# Altium PCB OmniCore_SDR.PcbDoc (part 8 of 14)
Units mil, origin at the board's own origin, x right, y up, seen from the top; angles counter-clockwise.
Board outline 4724.72 x 2755.91 mil, 8 copper layers (Top, GND 1, Layer 1, Layer 2, GND 2, Layer 3, Power, Bottom), stack 40.468 mil thick; 534 components, 427 nets, 2325 pads, 1892 vias.
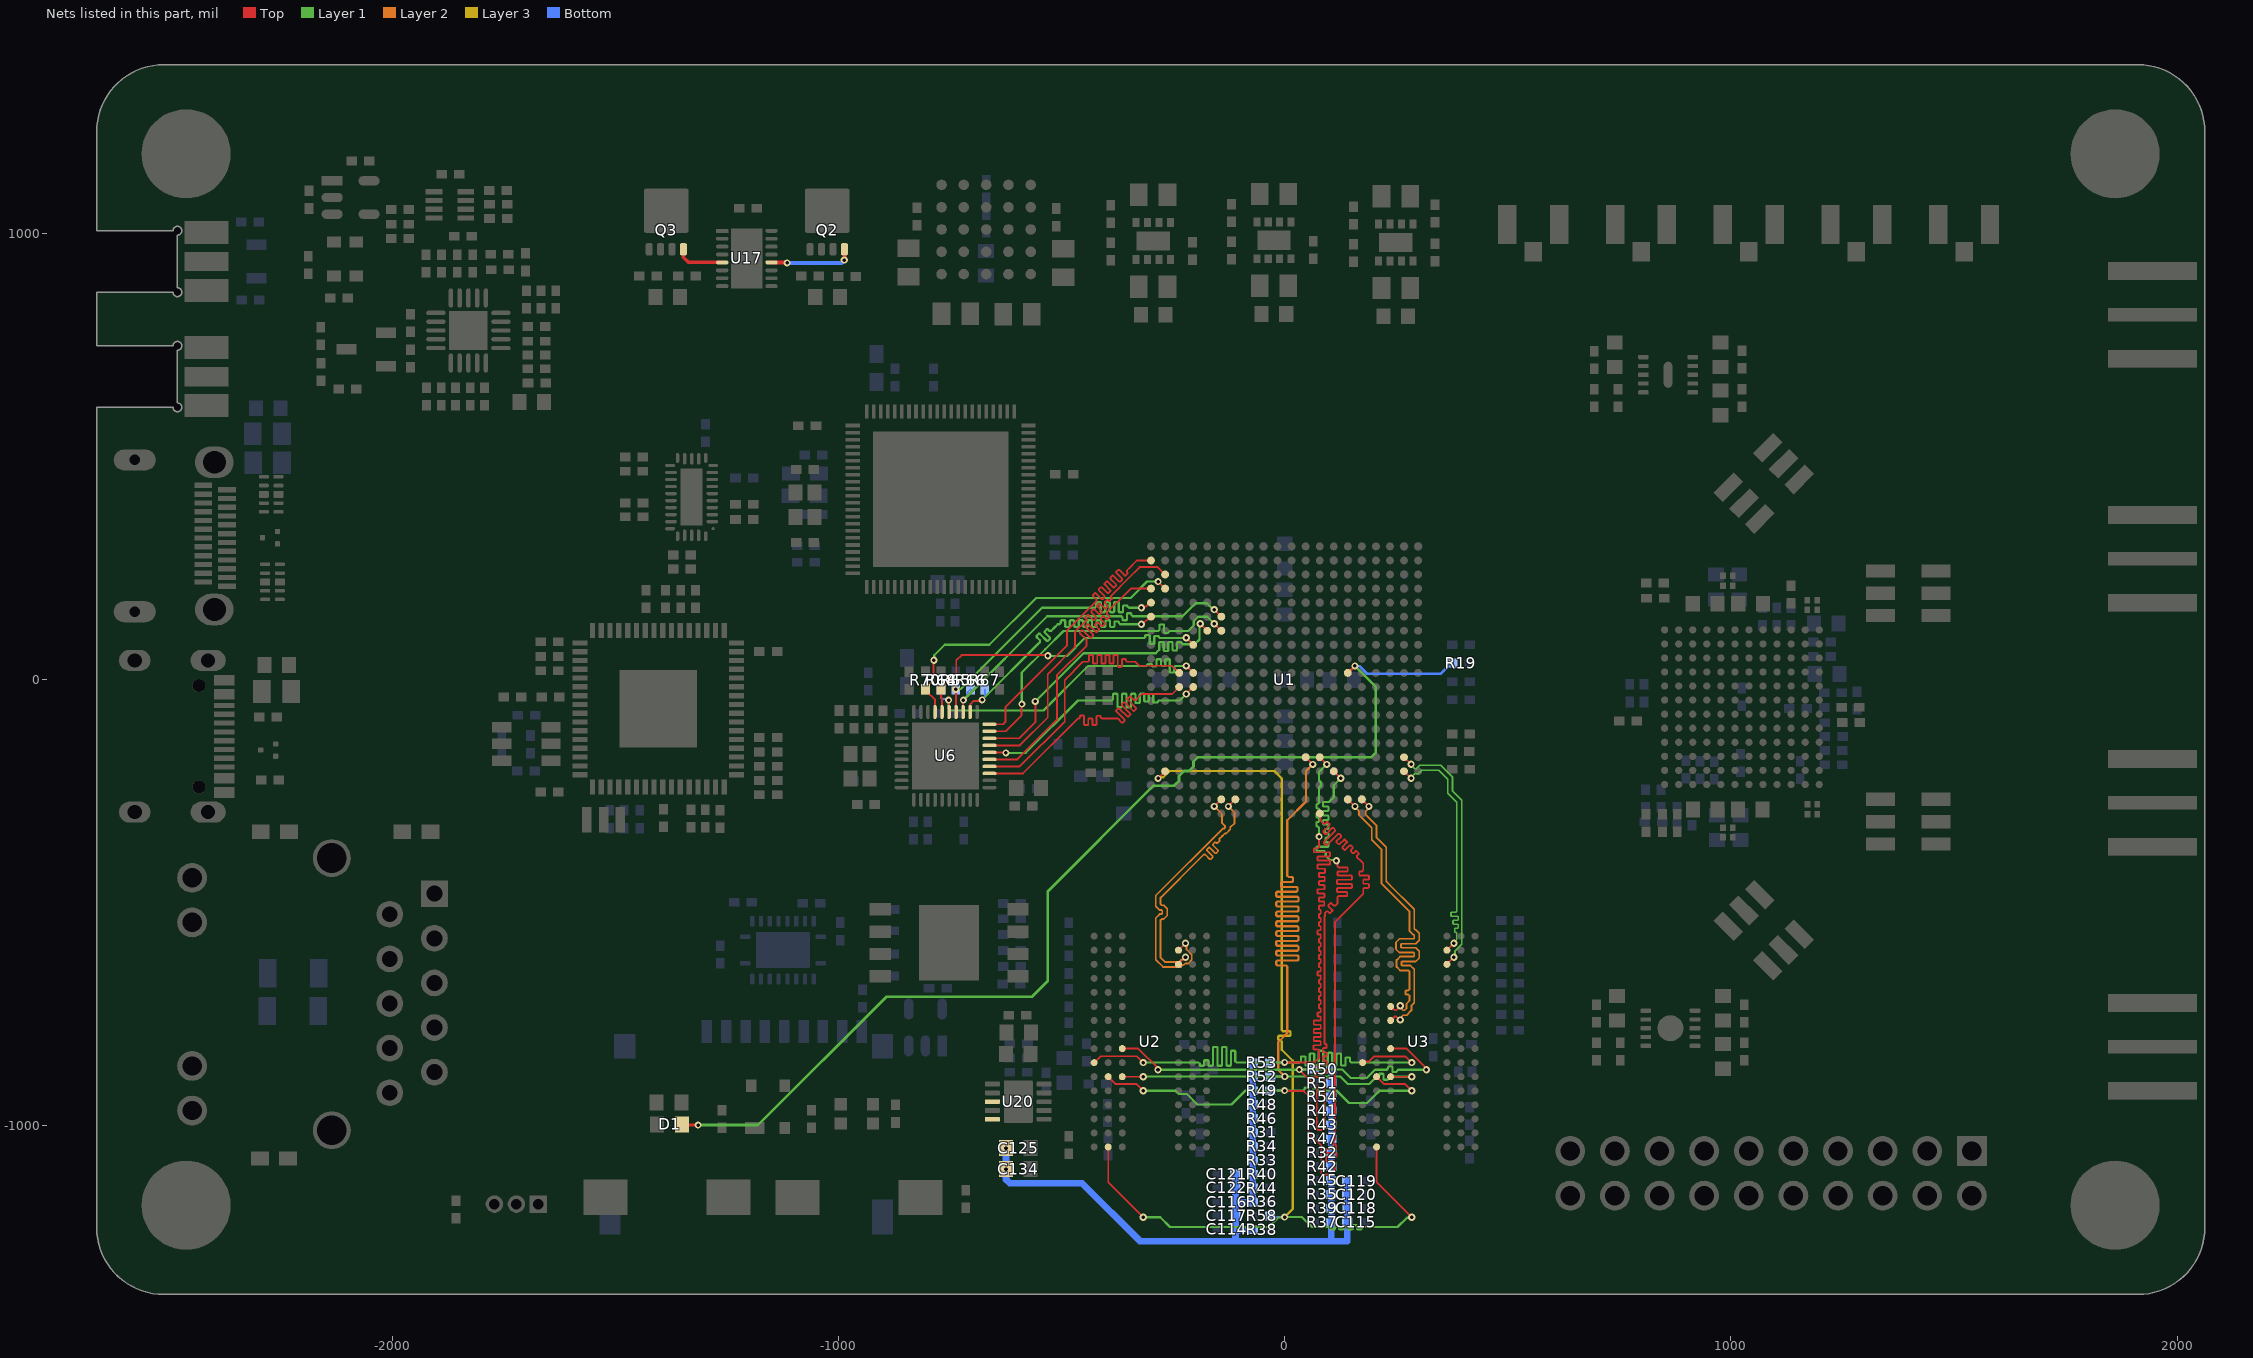
[diagram p13: the nets of this part, all layers, seen from the top]

## Via types
v1: diameter 16, hole 8, Top to Bottom, tented both sides, 1844 vias
v2: diameter 19.68, hole 7.87, Top to Bottom, 44 vias
v3: diameter 200, hole 125, Top to Bottom, 4 vias

## Nets (pads, with @x,y where several pads share a name; then routed paths per layer and width w, separated by ;. In a path a pad name is that pad's centre, name@x,y a point inside that pad or via, vN(x,y) a via of type N, cw(c..) or ccw(c..) an arc to the next point about the centre after c; other vN are vias at no path point) (continued)
DDR3_DQS1_N: U1.F2 U2.B7 | length 618.8
  Top w4: U2.B7@-238,-606.49 v1(-222.25,-590.75) ; v1(-157.72,-284.25) U1.F2@-141.98,-268.5
  Layer 2 w4: v1(-222.25,-590.75) -219.96,-593.04 -219.96,-604.74 -208.25,-616.44 -208.25,-628.04 -216.45,-636.24 -223.04,-636.24 -226.04,-639.24 -227.55,-639.24 -232.4,-644.09 -272.47,-644.09 -289,-627.56 -289,-549 -289,-534.35 -280.21,-525.57 -275.71,-525.57 -274.36,-524.22 -274.36,-517.92 -275.71,-516.57 -280.21,-516.57 -289,-507.78 -289,-498 -289,-483.97 -138.93,-333.89 -135.88,-333.89 -133.54,-331.55 -133.54,-328.24 -140.23,-321.55 -140.23,-301.75 v1(-157.72,-284.25)
DDR3_DQS1_P: U1.G2 U2.C7 | length 619.1
  Top w4: U2.C7@-238,-637.99 v1(-222.25,-622.24) ; v1(-126.23,-284.25) U1.G2@-110.48,-268.5
  Layer 2 w4: v1(-222.25,-622.24) -224.6,-622.24 -230.6,-628.24 -232.11,-628.24 -236.96,-633.09 -267.91,-633.09 -278,-623 -278,-549 -278,-538.91 -275.66,-536.57 -271.15,-536.57 -263.36,-528.77 -263.36,-513.36 -271.15,-505.57 -275.66,-505.57 -278,-503.22 -278,-498 -278,-488.52 -189.24,-399.76 -181.46,-391.98 -178.15,-391.98 -167.53,-402.6 -165.62,-402.6 -161.17,-398.14 -161.17,-396.24 -174.61,-382.8 -174.61,-380.89 -170.15,-376.43 -168.24,-376.43 -155.69,-388.98 -153.78,-388.98 -149.33,-384.53 -149.33,-382.62 -160.71,-371.23 -160.71,-369.32 -156.26,-364.87 -154.35,-364.87 -152.69,-366.53 -150.78,-366.53 -146.33,-362.07 -146.33,-360.16 -146.33,-356.85 -140.24,-350.76 -134.37,-344.89 -131.33,-344.89 -121.78,-335.35 -121.78,-331.1 -112.23,-321.55 -112.23,-298.25 v1(-126.23,-284.25)
DDR3_DQS2_N: U1.T2 U3.G3 | length 730.1
  Top w4: U1.T2@172.98,-268.5 v1(188.73,-284.25) ; U3.G3@237.51,-763.97 246.26,-755.23 250.2,-755.23 257.52,-762.55 257.52,-763.97 v1(259,-762.5)
  Layer 2 w4: v1(188.73,-284.25) 188.73,-287.5 181.48,-294.75 181.48,-302.87 206,-327.38 206,-354 227.72,-375.72 227.72,-452.17 234.78,-459.22 290.5,-514.94 290.5,-553.22 290.5,-558.44 292.84,-560.79 293.71,-560.79 301.5,-568.58 301.5,-583.99 293.71,-591.79 261.85,-591.79 260.5,-593.14 260.5,-599.44 261.85,-600.79 293.71,-600.79 301.5,-608.58 301.5,-623.99 293.71,-631.79 263.06,-631.79 261.71,-633.14 261.71,-639.44 263.06,-640.79 281.71,-640.79 290.5,-649.57 290.5,-667 290.5,-724.44 284,-730.94 284,-741.36 273.11,-752.25 265.24,-752.25 262.89,-754.59 262.89,-755.35 259,-759.25 v1(259,-762.5)
DDR3_DQS2_P: U1.R2 U3.F3 | length 730.3
  Top w4: U1.R2@141.49,-268.5 141.69,-268.5 157.44,-284.25 v1(157.64,-284.25) ; U3.F3@238.99,-731 U3.F3@237.51,-732.48 246.26,-741.23 250.2,-741.23 259,-732.43 v1(259,-731)
  Layer 2 w4: v1(157.64,-284.25) 157.64,-285.68 166.82,-294.87 166.82,-303.76 195,-331.94 195,-358.56 216.72,-380.28 216.72,-456.72 230.89,-470.89 279.5,-519.5 279.5,-553.22 279.5,-563 288.29,-571.79 289.15,-571.79 290.5,-573.14 290.5,-579.44 289.15,-580.79 257.29,-580.79 249.5,-588.58 249.5,-603.99 257.29,-611.79 289.15,-611.79 290.5,-613.14 290.5,-619.44 289.15,-620.79 258.51,-620.79 250.71,-628.58 250.71,-643.99 258.51,-651.79 277.16,-651.79 279.5,-654.13 279.5,-667 279.5,-675 279.5,-694.31 277.16,-696.66 271.92,-696.66 270.57,-698.01 270.57,-704.31 271.92,-705.66 277.16,-705.66 279.5,-708 279.5,-710 279.5,-719.89 273,-726.39 273,-736.8 268.55,-741.25 265.24,-741.25 262.89,-738.9 262.89,-738.14 259,-734.25 v1(259,-731)
DDR3_DQS3_N: U1.W4 U3.B7 | length 576.8
  Top w4: U1.W4@267.47,-205.51 v1(283.22,-221.26) ; U3.B7@363.5,-606.49 v1(379.25,-590.75)
  Layer 1 w4: v1(283.22,-221.26) 283.22,-218.92 291.13,-211.01 299,-211.01 307.01,-203 345,-203 365.37,-223.37 365.37,-254.93 385.74,-275.3 385.74,-508 385.74,-519 383.4,-521.34 373.85,-521.34 372.5,-522.69 372.5,-528.99 373.85,-530.34 387.39,-530.34 388.74,-531.69 388.74,-537.99 387.39,-539.34 378.49,-539.34 377.14,-540.69 377.14,-546.99 378.49,-548.34 387.39,-548.34 388.74,-549.69 388.74,-555.99 387.39,-557.34 382.47,-557.34 381.12,-558.69 381.12,-564.99 382.47,-566.34 383.4,-566.34 385.74,-568.69 385.74,-581.17 385.74,-582.4 379.25,-588.9 v1(379.25,-590.75)
DDR3_DQS3_P: U1.W5 U3.C7 | length 576.8
  Top w4: U1.W5@267.47,-174.02 v1(283.22,-189.76) ; U3.C7@363.5,-637.99 v1(379.25,-622.24)
  Layer 1 w4: v1(283.22,-189.76) 283.22,-192.1 291.13,-200.01 294.44,-200.01 302.46,-192 349.56,-192 376.37,-218.81 376.37,-250.37 396.74,-270.74 396.74,-593.5 381.54,-608.7 381.54,-619.95 v1(379.25,-622.24)
DDR3_ODT: R53.2 U1.N5 U2.K1 U3.K1 | length 2637.1
  Top w4.2: U2.K1@-426.98,-858.46 -412.51,-844 -331.32,-844 v1(-316.85,-858.46) ; v1(0,-858) 12,-858 66,-858 77,-847 77,-833.25 77,-831.15 74.54,-828.69 65.81,-828.69 64.89,-827.77 64.89,-820.41 65.81,-819.49 79.78,-819.49 80.7,-818.57 80.7,-811.21 79.78,-810.29 66.02,-810.29 65.1,-809.37 65.1,-802.01 66.02,-801.09 79.78,-801.09 80.7,-800.17 80.7,-792.81 79.78,-791.89 66.02,-791.89 65.1,-790.97 65.1,-783.61 66.02,-782.69 79.78,-782.69 80.7,-781.77 80.7,-774.41 79.78,-773.49 66.02,-773.49 65.1,-772.57 65.1,-765.21 66.02,-764.29 79.78,-764.29 80.7,-763.37 80.7,-756.01 79.78,-755.09 74.84,-755.09 73.92,-754.17 73.92,-746.81 74.84,-745.89 79.78,-745.89 80.7,-744.97 80.7,-737.61 79.78,-736.69 77.92,-736.69 77,-735.77 77,-728.41 77.92,-727.49 79.78,-727.49 80.7,-726.57 80.7,-719.21 79.78,-718.29 77.57,-718.29 76.64,-717.37 76.64,-710.01 77.57,-709.09 79.78,-709.09 80.7,-708.17 80.7,-700.81 79.78,-699.89 77.92,-699.89 77,-698.97 77,-691.61 77.92,-690.69 79.78,-690.69 80.7,-689.77 80.7,-682.41 79.78,-681.49 77.92,-681.49 77,-680.57 77,-673.21 77.92,-672.29 79.78,-672.29 80.7,-671.37 80.7,-664.01 79.78,-663.09 74.84,-663.09 73.92,-662.17 73.92,-654.81 74.84,-653.89 79.78,-653.89 80.7,-652.97 80.7,-645.61 79.78,-644.69 77.92,-644.69 77,-643.77 77,-636.41 77.92,-635.49 79.78,-635.49 80.7,-634.57 80.7,-627.21 79.78,-626.29 77.57,-626.29 76.64,-625.37 76.64,-618.01 77.57,-617.09 79.78,-617.09 80.7,-616.17 80.7,-608.81 79.78,-607.89 77.92,-607.89 77,-606.97 77,-599.61 77.92,-598.69 79.78,-598.69 80.7,-597.77 80.7,-590.41 79.78,-589.49 77.92,-589.49 77,-588.57 77,-581.21 77.92,-580.29 79.78,-580.29 80.7,-579.37 80.7,-572.01 79.78,-571.09 74.84,-571.09 73.92,-570.17 73.92,-562.81 74.84,-561.89 79.78,-561.89 80.7,-560.97 80.7,-553.61 79.78,-552.69 77.92,-552.69 77,-551.77 77,-544.41 77.92,-543.49 79.78,-543.49 80.7,-542.57 80.7,-535.21 79.78,-534.29 77.57,-534.29 76.64,-533.37 76.64,-526.01 77.57,-525.09 79.78,-525.09 80.7,-524.17 80.7,-516.81 79.78,-515.89 77.92,-515.89 77,-514.97 77,-507.61 77.92,-506.69 87.74,-506.69 88.66,-505.77 88.66,-498.41 87.74,-497.49 77.92,-497.49 77,-496.57 77,-489.21 77.92,-488.29 87.98,-488.29 88.9,-487.37 88.9,-480.01 87.98,-479.09 74.84,-479.09 73.92,-478.17 73.92,-470.81 74.84,-469.89 87.98,-469.89 88.9,-468.97 88.9,-461.61 87.98,-460.69 77.92,-460.69 77,-459.77 77,-452.41 77.92,-451.49 88.98,-451.49 89.9,-450.57 89.9,-443.21 88.98,-442.29 77.57,-442.29 76.64,-441.37 76.64,-434.01 77.57,-433.09 89.05,-433.09 89.97,-432.17 89.97,-424.81 89.05,-423.89 74.77,-423.89 73.85,-422.97 73.85,-415.61 74.77,-414.69 100.98,-414.69 101.9,-413.77 101.9,-406.41 100.98,-405.49 74.77,-405.49 73.85,-404.57 73.85,-397.21 74.77,-396.29 100.98,-396.29 101.9,-395.37 101.9,-388.01 100.98,-387.09 66.55,-387.09 65.63,-386.17 65.63,-378.81 66.55,-377.89 74.54,-377.89 77,-375.43 77,-368 v1(77,-352) ; U1.N5@78.5,-174.02 78.5,-174.13 94.24,-189.88 v1(94.24,-190) ; U3.K1@174.52,-858.46 176.73,-856.26 188.48,-856.26 200.23,-844.5 270.68,-844.5 v1(284.64,-858.46)
  Layer 1 w5: v1(-316.85,-858.46) -316.62,-858.23 -280,-858.23 -206,-858.23 -193.5,-858.23 -190.57,-861.16 -190.57,-863.71 -189.07,-865.21 -182.07,-865.21 -180.57,-863.71 -180.57,-854.53 -179.07,-853.03 -172.07,-853.03 -170.57,-854.53 -170.57,-863.71 -169.07,-865.21 -162.07,-865.21 -160.57,-863.71 -160.57,-824.73 -159.07,-823.23 -152.07,-823.23 -150.57,-824.73 -150.57,-863.71 -149.07,-865.21 -142.07,-865.21 -140.57,-863.71 -140.57,-824.73 -139.07,-823.23 -132.07,-823.23 -130.57,-824.73 -130.57,-863.71 -129.07,-865.21 -122.07,-865.21 -120.57,-863.71 -120.57,-833.48 -119.07,-831.98 -112.07,-831.98 -110.57,-833.48 -110.57,-855.3 -107.64,-858.23 -89,-858.23 -0.23,-858.23 v1(0,-858) 0.23,-858.23 31,-858.23 33.5,-858.23 36.43,-855.3 36.43,-845.93 37.93,-844.43 44.93,-844.43 46.43,-845.93 46.43,-863.48 47.93,-864.98 54.93,-864.98 56.43,-863.48 56.43,-839.48 57.93,-837.98 64.93,-837.98 66.43,-839.48 66.43,-863.48 67.93,-864.98 74.93,-864.98 76.43,-863.48 76.43,-833.13 77.93,-831.63 84.93,-831.63 86.43,-833.13 86.43,-863.48 87.93,-864.98 94.93,-864.98 96.43,-863.48 96.43,-837.54 97.93,-836.04 104.93,-836.04 106.43,-837.54 106.43,-863.48 107.93,-864.98 114.93,-864.98 116.43,-863.48 116.43,-839.44 117.93,-837.94 124.93,-837.94 126.43,-839.44 126.43,-863.48 127.93,-864.98 134.93,-864.98 136.43,-863.48 136.43,-848.17 137.93,-846.67 144.93,-846.67 146.43,-848.17 146.43,-855.3 149.36,-858.23 165.18,-858.23 202.56,-858.23 284.41,-858.23 v1(284.64,-858.46) ; v1(77,-352) 77,-334.44 77,-331.94 74.07,-329.01 73,-329.01 71.5,-327.51 71.5,-320.51 73,-319.01 75.5,-319.01 77,-317.51 77,-310.51 75.5,-309.01 73,-309.01 71.5,-307.51 71.5,-300.51 73,-299.01 75.5,-299.01 77,-297.51 77,-290.51 75.5,-289.01 73,-289.01 71.5,-287.51 71.5,-280.51 73,-279.01 74.07,-279.01 77,-276.09 77,-241.94 79.93,-239.01 79.99,-239.01 81.49,-237.51 81.49,-230.51 79.99,-229.01 79.93,-229.01 77,-226.09 77,-217 77,-207.01 94.01,-190 v1(94.24,-190)
  Bottom w4.2: R53.2@-32,-859 -31,-858 v1(0,-858)
DDR3_RAS: R50.2 U1.P4 U2.J3 U3.J3 | length 2366.9
  Top w4.2: U2.J3@-363.98,-826.97 -328.41,-826.97 -283.85,-871.52 v1(-283.85,-874.44) ; v1(33.07,-874) 72,-912.92 72,-1007.21 74.46,-1009.67 86.44,-1009.67 88.9,-1007.21 88.9,-895 88.9,-892.9 86.44,-890.44 70.28,-890.44 68.9,-889.06 68.9,-882.62 70.28,-881.24 92.42,-881.24 93.8,-879.86 93.8,-873.42 92.42,-872.04 76.14,-872.04 74.76,-870.66 74.76,-864.22 76.14,-862.84 92.42,-862.84 93.8,-861.46 93.8,-855.02 92.42,-853.64 86.58,-853.64 85.2,-852.26 85.2,-845.82 86.58,-844.44 92.42,-844.44 93.8,-843.06 93.8,-836.62 92.42,-835.24 86.58,-835.24 85.2,-833.86 85.2,-827.42 86.58,-826.04 92.42,-826.04 93.8,-824.66 93.8,-818.22 92.42,-816.84 91.36,-816.84 88.9,-814.38 88.9,-531.1 90.39,-529.61 90.39,-526.14 89.86,-525.61 89.86,-523.66 94.42,-519.11 96.37,-519.11 100.36,-523.1 102.31,-523.1 106.86,-518.54 106.86,-516.59 97.8,-507.53 97.8,-505.57 102.35,-501.02 104.3,-501.02 109.9,-506.62 113.38,-506.62 118.1,-501.9 118.1,-499.07 118.1,-487.77 120.56,-485.31 138.71,-485.31 140.09,-483.93 140.09,-477.49 138.71,-476.11 118.41,-476.11 117.03,-474.73 117.03,-468.29 118.41,-466.91 149.42,-466.91 150.8,-465.53 150.8,-459.09 149.42,-457.71 118.48,-457.71 117.1,-456.33 117.1,-449.89 118.48,-448.51 149.42,-448.51 150.8,-447.13 150.8,-440.69 149.42,-439.31 119.48,-439.31 118.1,-437.93 118.1,-431.49 119.48,-430.11 139.94,-430.11 141.32,-428.73 141.32,-422.29 139.94,-420.91 120.56,-420.91 118.1,-418.45 118.1,-408.1 v1(116,-406) ; U1.P4@109.99,-205.51 v1(125.74,-221.26) ; U3.J3@237.51,-826.97 273.09,-826.97 317.64,-871.52 v1(317.64,-874.44)
  Layer 1 w5: v1(-283.85,-874.44) -283.62,-874.21 v1@32.86,-874.21 ; v1@33,-873.98 128.98,-873.98 148,-893 184,-893 202.56,-874.44 226,-874.44 228.5,-874.44 231.43,-871.51 231.43,-868.73 232.93,-867.23 239.93,-867.23 241.43,-868.73 241.43,-878.14 242.93,-879.64 249.93,-879.64 251.43,-878.14 251.43,-877.37 254.36,-874.44 288,-874.44 v1(317.64,-874.44) ; v1(116,-406) 114.04,-404.04 100.5,-404.04 92,-395.54 92,-390 92,-387.5 89.07,-384.57 73,-384.57 71.5,-383.07 71.5,-376.07 73,-374.57 96.5,-374.57 98,-373.07 98,-366.07 96.5,-364.57 93,-364.57 91.5,-363.07 91.5,-356.07 93,-354.57 96.5,-354.57 98,-353.07 98,-346.07 96.5,-344.57 91.58,-344.57 90.08,-343.07 90.08,-336.07 91.58,-334.57 96.5,-334.57 98,-333.07 98,-326.07 96.5,-324.57 87.5,-324.57 86,-323.07 86,-316.07 87.5,-314.57 96.5,-314.57 98,-313.07 98,-306.07 96.5,-304.57 87.5,-304.57 86,-303.07 86,-296.07 87.5,-294.57 96.5,-294.57 98,-293.07 98,-286.07 96.5,-284.57 87.5,-284.57 86,-283.07 86,-276.07 87.5,-274.57 99.43,-274.57 110,-264 110,-237 v1(125.74,-221.26)
  Bottom w4.2: v1(33.07,-874) 64,-874 R50.2@65,-873
DDR3_RESET: R58.1 U1.B4 U2.T2 U3.T2 | length 2447.3
  Top w4.2: U2.T2@-395.48,-1047.44 -395.48,-1126.29 v1(-316.85,-1204.92) ; v1(-283.71,-221.27) U1.B4@-267.96,-205.51 ; U3.T2@206.02,-1047.44 206.02,-1126.29 v1(284.64,-1204.92)
  Layer 1 w5: v1(-316.85,-1204.92) -279.08,-1204.92 -257,-1227 -35,-1227 -13.19,-1205.19 -0.73,-1205.19 v1(0,-1204.46) 38.46,-1204.46 61,-1227 87,-1227 99.5,-1227 102.43,-1229.93 102.43,-1230.5 103.93,-1232 110.93,-1232 112.43,-1230.5 112.43,-1228.5 113.93,-1227 120.93,-1227 122.43,-1228.5 122.43,-1230.5 123.93,-1232 130.93,-1232 132.43,-1230.5 132.43,-1227.65 133.93,-1226.15 140.93,-1226.15 142.43,-1227.65 142.43,-1230.5 143.93,-1232 150.93,-1232 152.43,-1230.5 152.43,-1224.5 153.93,-1223 160.93,-1223 162.43,-1224.5 162.43,-1230.45 163.93,-1231.95 170.93,-1231.95 172.43,-1230.45 172.43,-1229.93 175.36,-1227 202,-1227 253,-1227 273.9,-1206.1 283.47,-1206.1 v1(284.64,-1204.92)
  Layer 3 w5: v1(-283.71,-221.27) -281.6,-219.16 -275.44,-219.16 -275.28,-219 -271.84,-219 -257.84,-205 -23,-205 -6.5,-221.5 -6.5,-494.4 -6.8,-494.7 -6.8,-782.9 -6.8,-785.4 -3.87,-788.33 11.7,-788.33 13.2,-789.83 13.2,-796.83 11.7,-798.33 -12.71,-798.33 -14.21,-799.83 -14.21,-806.83 -12.71,-808.33 -9.73,-808.33 -6.8,-811.26 -6.8,-817.6 -6.8,-829.3 18,-854.1 18,-1186.46 v1(0,-1204.46)
  Bottom w4.2: R58.1@-32,-1201.83 -29.38,-1204.46 v1(0,-1204.46)
DDR3_S0: R49.2 U1.N1 U2.L2 U3.L2 | length 2399
  Top w4.2: U2.L2@-395.48,-889.96 -379.44,-906 -332.31,-906 v1(-316.85,-921.45) ; v1(0,-920.99) 1.21,-922.2 43.2,-922.2 53,-932 53,-1015 82.05,-1044.05 82.05,-1106.24 84.51,-1108.7 105.7,-1108.7 113,-1101.4 113,-1083.52 113,-1081.42 110.54,-1078.96 94.38,-1078.96 93,-1077.58 93,-1071.14 94.38,-1069.76 114.42,-1069.76 115.8,-1068.38 115.8,-1061.94 114.42,-1060.56 94.38,-1060.56 93,-1059.18 93,-1052.74 94.38,-1051.36 113.61,-1051.36 114.99,-1049.98 114.99,-1043.54 113.61,-1042.16 110.54,-1042.16 109.16,-1040.78 109.16,-1034.34 110.54,-1032.96 113,-1030.5 113,-1008 113,-543 172,-484 176,-480 176,-469.22 178.46,-466.76 187.42,-466.76 188.8,-465.38 188.8,-458.94 187.42,-457.56 177.38,-457.56 176,-456.18 176,-449.74 177.38,-448.36 187.42,-448.36 188.8,-446.98 188.8,-440.54 187.42,-439.16 168.58,-439.16 167.2,-437.78 167.2,-431.34 168.58,-429.96 173.54,-429.96 176,-427.5 176,-421 176,-412 170.01,-406.01 162.02,-398.02 162.02,-394.54 165.5,-391.05 165.5,-389.1 160.95,-384.55 159,-384.55 154.75,-388.8 152.8,-388.8 148.24,-384.24 148.24,-382.29 152.49,-378.04 152.49,-376.09 147.94,-371.53 145.99,-371.53 135.71,-381.81 133.75,-381.81 129.2,-377.26 129.2,-375.31 139.48,-365.03 139.48,-363.08 134.93,-358.52 132.98,-358.52 122.57,-368.92 120.62,-368.92 116.07,-364.37 116.07,-362.42 126.47,-352.02 126.47,-350.07 121.92,-345.51 119.96,-345.51 94.5,-370.98 92.55,-370.98 88,-366.42 88,-364.47 113.46,-339.01 113.46,-337.06 108.91,-332.5 106.95,-332.5 93.17,-346.28 91.22,-346.28 86.67,-341.73 86.67,-339.78 100.45,-326 100.45,-324.05 95.89,-319.49 93.94,-319.49 90.46,-322.98 86.98,-322.98 85.14,-321.14 80.47,-316.47 80.47,-301.97 U1.N1@78.5,-300 ; U3.L2@206.02,-889.96 222.06,-906 269.19,-906 v1(284.64,-921.45)
  Layer 1 w5: v1(-316.85,-921.45) -244.55,-921.45 -237.57,-928.43 -219.57,-928.43 -196,-952 -119,-952 -87.99,-920.99 v1(0,-920.99) 39,-920.99 41.5,-920.99 44.43,-918.06 44.43,-916.05 45.93,-914.55 52.93,-914.55 54.43,-916.05 54.43,-926.47 55.93,-927.97 62.93,-927.97 64.43,-926.47 64.43,-917.61 65.93,-916.11 72.93,-916.11 74.43,-917.61 74.43,-923.92 75.93,-925.42 82.93,-925.42 84.43,-923.92 87.36,-920.99 98.1,-920.99 115.99,-920.99 144,-949 184.83,-949 212.38,-921.45 v1(284.64,-921.45)
  Bottom w4.2: R49.2@-32,-921.33 -31.66,-920.99 v1(0,-920.99)
DDR3_WE: R52.2 U1.M5 U2.L3 U3.L3 | length 2320.8
  Top w4.2: U2.L3@-363.98,-889.96 v1(-316.85,-889.96) ; U1.M5@47,-174.02 v1(63,-190) ; U3.L3@237.51,-889.96 v1(284.64,-889.96)
  Layer 1 w5: v1(-316.85,-889.96) -316.62,-889.73 -0.23,-889.73 v1(0,-889.49) 0.23,-889.73 124.73,-889.73 141,-906 190,-906 206.27,-889.73 208.77,-889.73 211.7,-886.8 211.7,-884.94 213.2,-883.44 220.2,-883.44 221.7,-884.94 221.7,-895.11 223.2,-896.61 230.2,-896.61 231.7,-895.11 231.7,-892.66 234.63,-889.73 253,-889.73 284.41,-889.73 v1(284.64,-889.96)
  Layer 2 w5: v1(0,-889.49) -14.5,-874.99 -14.5,-812.5 6,-792 6,-744 6,-736.81 6,-646 6,-643.5 3.07,-640.57 -16.8,-640.57 -19,-638.37 -19,-631.77 -16.8,-629.57 28.8,-629.57 31,-627.37 31,-620.77 28.8,-618.57 -16.8,-618.57 -19,-616.37 -19,-609.77 -16.8,-607.57 28.8,-607.57 31,-605.37 31,-598.77 28.8,-596.57 -16.8,-596.57 -19,-594.37 -19,-587.77 -16.8,-585.57 28.8,-585.57 31,-583.37 31,-576.77 28.8,-574.57 -16.8,-574.57 -19,-572.37 -19,-565.77 -16.8,-563.57 28.8,-563.57 31,-561.37 31,-554.77 28.8,-552.57 -16.8,-552.57 -19,-550.37 -19,-543.77 -16.8,-541.57 28.8,-541.57 31,-539.37 31,-532.77 28.8,-530.57 -16.8,-530.57 -19,-528.37 -19,-521.77 -16.8,-519.57 28.8,-519.57 31,-517.37 31,-510.77 28.8,-508.57 -16.8,-508.57 -19,-506.37 -19,-499.77 -16.8,-497.57 28.8,-497.57 31,-495.37 31,-488.77 28.8,-486.57 -16.8,-486.57 -19,-484.37 -19,-477.77 -16.8,-475.57 26.3,-475.57 28.5,-473.37 28.5,-466.77 26.3,-464.57 -6.3,-464.57 -8.5,-462.37 -8.5,-455.77 -6.3,-453.57 16.37,-453.57 18.57,-451.37 18.57,-444.77 16.37,-442.57 8.93,-442.57 6,-439.64 6,-361.5 6,-315 48,-273 48,-205 v1(63,-190)
  Bottom w4.2: R52.2@-32,-890.17 -31.33,-889.49 v1(0,-889.49)
DDRVTT: C114.2 C115.2 C116.2 C117.2 C118.2 C119.2 C120.2 C121.2 C122.2 C125.1 C134.1 R31.1 R32.1 R33.1 R34.1 R35.1 R36.1 R37.1 R38.1 R39.1 R40.1 R41.1 R42.1 R43.1 R44.1 R45.1 R46.1 R47.1 R48.1 R49.1 R50.1 R51.1 R52.1 R53.1 R54.1 U20.3 U20.5 | length 1940.6
  Bottom w15: v1(-624.56,-1050) v1(-624.56,-1097) -624.56,-1120.2 -615.96,-1128.8 -454.2,-1128.8 -324.59,-1258.41 -110.31,-1258.41 ; C121.2@-110.31,-1108 C122.2@-110.31,-1139 C116.2@-110.31,-1171 ; R38.1@-71.37,-1233 -109.31,-1233 C114.2@-110.31,-1232 ; R53.1@-71.37,-859 R52.1@-71.37,-890.17 R48.1@-71.37,-952.5 R46.1@-71.37,-983.67 R31.1@-71.37,-1014.83 R34.1@-71.37,-1046 R33.1@-71.37,-1077.17 R40.1@-71.37,-1108.33 R44.1@-71.37,-1139.5 R36.1@-71.37,-1170.67 -71.7,-1171 C116.2@-110.31,-1171 ; R50.1@104.37,-873 R51.1@104.37,-904.18 R54.1@104.37,-935.36 R41.1@104.37,-966.55 R43.1@104.37,-997.73 R47.1@104.37,-1028.91 R32.1@104.37,-1060.09 R42.1@104.37,-1091.27 R45.1@104.37,-1122.45 ; R45.1@105.92,-1124 R45.1@104.37,-1122.45 ; 140.31,-1199.8 140.5,-1199.99 140.5,-1258.41 104.37,-1258.41 ; C119.2@140.31,-1124 140.66,-1124.34 140.66,-1184.66 C118.2@141,-1185 ; -110.31,-1258.41 104.37,-1258.41 ; -110.31,-1258.41 C114.2@-110.31,-1232 ; C114.2@-110.31,-1232 C117.2@-110.31,-1201 C116.2@-110.31,-1171 ; 104.37,-1258.41 R37.1@104.37,-1216 R39.1@104.37,-1184.82 R35.1@104.37,-1153.64 R45.1@104.37,-1122.45
DONE: D1.1 R19.1 U1.R11 | length 2501.9
  Top w6: D1.1@-1349.78,-998.27 v1(-1314.61,-998.27) ; U1.R11@141.49,14.96 v1(157.24,30.71)
  Layer 1 w6: v1(-1314.61,-998.27) -1180.27,-998.27 -892.75,-710.75 -566.26,-710.75 -531,-675.48 -531,-475 -293.76,-237.76 -247.5,-237.76 -237,-227.26 -237,-216.33 -225.67,-205 -214.5,-205 -204.22,-194.72 -204.22,-183.55 -194.67,-174 194.21,-174 204.4,-163.81 204.4,-16.46 v1(157.24,30.71)
  Bottom w6: v1(157.24,30.71) 158.23,29.72 168.28,29.72 185,13 349.35,13 373.35,37 R19.1@375.31,37
ETH_MDC: U1.C10 U6.13 | length 748.4
  Top w4.2: U6.13@-661.6,-210.4 -586.4,-210.4 -463.1,-87.1 -461,-87.1 -458.54,-84.64 -458.54,-81.98 -457.16,-80.6 -450.72,-80.6 -449.34,-81.98 -449.34,-100.72 -447.96,-102.1 -441.52,-102.1 -440.14,-100.72 -440.14,-88.48 -438.76,-87.1 -432.32,-87.1 -430.94,-88.48 -430.94,-100.72 -429.56,-102.1 -423.12,-102.1 -421.74,-100.72 -421.74,-82.3 -420.36,-80.92 -413.92,-80.92 -412.54,-82.3 -412.54,-84.64 -410.08,-87.1 -398.9,-87.1 -374.52,-87.1 -365.18,-96.44 -363.23,-96.44 -358.67,-91.89 -358.67,-89.93 -377.93,-70.67 -377.93,-68.72 -373.38,-64.17 -371.43,-64.17 -352.17,-83.43 -350.22,-83.43 -345.66,-78.88 -345.66,-76.92 -364.92,-57.66 -364.92,-55.71 -360.37,-51.16 -358.42,-51.16 -339.16,-70.42 -337.21,-70.42 -332.65,-65.86 -332.65,-63.91 -351.91,-44.65 -351.91,-42.7 -347.36,-38.15 -345.41,-38.15 -337.52,-46.04 -334.04,-46.04 -326.5,-38.5 -320.28,-32.28 -252.21,-32.28 U1.C10@-236.46,-16.54
ETH_MDIO: U1.C11 U6.14 | length 748.5
  Top w4.2: U6.14@-661.6,-194.6 -593.6,-194.6 -493,-94 -493,-1 -452,40 -443.08,40 -440.98,40 -438.52,42.46 -438.52,53.62 -437.14,55 -430.7,55 -429.32,53.62 -429.32,37.32 -427.94,35.94 -421.5,35.94 -420.12,37.32 -420.12,53.62 -418.74,55 -412.3,55 -410.92,53.62 -410.92,37.32 -409.54,35.94 -403.1,35.94 -401.72,37.32 -401.72,53.62 -400.34,55 -393.9,55 -392.52,53.62 -392.52,37.32 -391.14,35.94 -384.7,35.94 -383.32,37.32 -383.32,53.62 -381.94,55 -375.5,55 -374.12,53.62 -374.12,29.98 -372.74,28.6 -366.3,28.6 -364.92,29.98 -364.92,44.44 -363.54,45.82 -357.1,45.82 -355.72,44.44 -355.72,42.46 -353.26,40 -345,40 -335,40 -326,31 -253,31 -252.75,31 -236.71,14.96 U1.C11@-236.46,14.96
ETH_RX_CLK: R70.2 U1.B17 U6.27 | length 731.7
  Top w4.2: R70.2@-805,-21.69 -805,-19.72 -787,-1.72 -787,42.21 v1(-786.03,43.17) ; R70.2@-803,-25.65 -783.6,-45.05 U6.27@-783.6,-72.6 ; v1(-283.71,219.68) U1.B17@-267.96,203.94
  Layer 1 w5: v1(-786.03,43.17) -785.47,43.74 -785.47,54.53 -762,78 -662,78 -557,183 -345,183 -308.32,219.68 v1(-283.71,219.68)
ETH_RX_CTRL: R68.2 U1.D13 U6.26 | length 731.7
  Top w4.2: U6.26@-767.9,-72.6 -767.9,-42.1 -770,-40 R68.2@-770,-21.69 -770,-19.72 -736,14.28 -736,43 -724,55 -532.23,55 v1(-530.73,53.5) ; v1(-220.72,93.7) U1.D13@-204.97,77.95
  Layer 1 w5: v1(-530.73,53.5) -530.23,53 -488,53 -448,93 -317.75,93 -315.25,93 -312.32,95.93 -312.32,98.5 -310.82,100 -303.82,100 -302.32,98.5 -302.32,81.1 -300.82,79.6 -293.82,79.6 -292.32,81.1 -292.32,95.93 -290.82,97.43 -283.82,97.43 -282.32,95.93 -279.39,93 -256,93 -221.42,93 v1(-220.72,93.7)
ETH_RXD0: R64.2 U1.D11 U6.25 | length 770.1
  Top w4.2: v1(-753,-46) -752.55,-46.45 -752.55,-72.15 U6.25@-752.1,-72.6 ; v1(-220.72,30.71) U1.D11@-204.97,14.96
  Layer 1 w5: v1(-753,-46) -753,-65 -748.5,-69.5 -540.5,-69.5 -440.29,30.71 -324.68,30.71 -310.36,30.71 -307.43,33.64 -305.93,35.14 -298.93,35.14 -297.43,33.64 -297.43,30.71 -295.93,29.21 -288.93,29.21 -287.43,30.71 -287.43,44.18 -285.93,45.68 -278.93,45.68 -277.43,44.18 -277.43,32.21 -275.93,30.71 -268.93,30.71 -267.43,32.21 -267.43,44.21 -265.93,45.71 -258.93,45.71 -257.43,44.21 -257.43,17.21 -255.93,15.71 -248.93,15.71 -247.43,17.21 -247.43,27.78 -244.5,30.71 -242,30.71 v1(-220.72,30.71)
  Bottom w4.2: R64.2@-770,-21.69 -770,-41 -767.26,-43.74 -755.26,-43.74 v1(-753,-46)
ETH_RXD1: R65.2 U1.A16 U6.24 | length 701
  Top w4.2: v1(-737,-22) -736.7,-22.3 -736.7,-72.3 U6.24@-736.4,-72.6 ; v1(-321,161) -318.74,163.26 -311.71,163.26 -302.53,172.44 U1.A16@-299.46,172.44
  Layer 1 w5: v1(-737,-22) -736.04,-21.04 -726.04,-21.04 -544,161 -427.5,161 -425,161 -422.07,163.93 -422.07,172.5 -420.57,174 -413.57,174 -412.07,172.5 -412.07,152.5 -410.57,151 -403.57,151 -402.07,152.5 -402.07,172.5 -400.57,174 -393.57,174 -392.07,172.5 -392.07,152.5 -390.57,151 -383.57,151 -382.07,152.5 -382.07,172.5 -380.57,174 -373.57,174 -372.07,172.5 -372.07,152.5 -370.57,151 -363.57,151 -362.07,152.5 -362.07,164.4 -360.57,165.9 -353.57,165.9 -352.07,164.4 -352.07,163.93 -349.14,161 -343,161 v1(-321,161)
ETH_RXD2: R66.2 U1.F15 U6.23 | length 762.7
  Top w4.2: U6.23@-720.6,-72.6 -720.3,-72.3 -720.3,-46.3 v1(-720,-46) ; v1(-157.72,156.69) U1.F15@-141.98,140.94
  Layer 1 w5: v1(-720,-46) -532,142 -379,142 -366.5,142 -363.57,139.07 -363.57,134.5 -362.07,133 -355.07,133 -353.57,134.5 -353.57,147.15 -352.07,148.65 -345.07,148.65 -343.57,147.15 -343.57,144.93 -340.64,142 -250,142 -229,142 -199.81,171.19 -173.96,171.19 -159.46,156.69 v1(-157.72,156.69)
  Bottom w4.2: v1(-720,-46) -710.92,-36.92 -710.92,-28.61 R66.2@-704,-21.69
ETH_RXD3: R67.2 U1.A15 U6.22 | length 758
  Top w4.2: U6.22@-704.9,-72.6 -704.2,-71.9 -704.2,-57.49 -703.7,-56.99 -703.7,-54.7 -696.75,-47.75 -680.26,-47.75 v1(-678,-45.5) ; v1(-321,124) -318.7,124 -301.76,140.94 U1.A15@-299.46,140.94
  Layer 1 w5: v1(-678,-45.5) -550.37,82.14 -548.6,83.9 -548.6,88.05 -556.07,95.52 -556.07,97.64 -551.13,102.59 -549,102.59 -532.85,86.44 -530.73,86.44 -525.78,91.39 -525.78,93.51 -537.9,105.63 -537.9,107.75 -532.95,112.7 -530.83,112.7 -527.39,109.26 -523.24,109.26 -515.75,116.75 -508.5,124 -507,124 -504.5,124 -501.57,126.93 -501.57,131.5 -500.07,133 -493.07,133 -491.57,131.5 -491.57,119.5 -490.07,118 -483.07,118 -481.57,119.5 -481.57,131.5 -480.07,133 -473.07,133 -471.57,131.5 -471.57,119.5 -470.07,118 -463.07,118 -461.57,119.5 -461.57,131.5 -460.07,133 -453.07,133 -451.57,131.5 -451.57,119.5 -450.07,118 -443.07,118 -441.57,119.5 -441.57,131.5 -440.07,133 -433.07,133 -431.57,131.5 -431.57,119.5 -430.07,118 -423.07,118 -421.57,119.5 -421.57,131.5 -420.07,133 -413.07,133 -411.57,131.5 -411.57,119.5 -410.07,118 -403.07,118 -401.57,119.5 -401.57,131.5 -400.07,133 -393.07,133 -391.57,131.5 -391.57,119.5 -390.07,118 -383.07,118 -381.57,119.5 -381.57,128.88 -380.07,130.38 -373.07,130.38 -371.57,128.88 -371.57,126.93 -368.64,124 -357,124 v1(-321,124)
  Bottom w4.2: v1(-678,-45.5) -678,-43.58 -672,-37.58 R67.2@-672,-21.69
ETH_TX_CLK: U1.A19 U6.20 | length 748.4
  Top w4.2: U6.20@-661.6,-100.1 -631.1,-100.1 -626,-95 -626,-62 -488,76 -488,109.88 -423.36,174.52 -421.87,176.01 -421.87,179.49 -429.76,187.38 -429.76,189.33 -425.21,193.88 -423.26,193.88 -409.93,180.56 -407.98,180.56 -403.43,185.11 -403.43,187.06 -416.75,200.39 -416.75,202.34 -412.2,206.9 -410.25,206.9 -396.92,193.57 -394.97,193.57 -390.41,198.12 -390.41,200.07 -403.74,213.4 -403.74,215.35 -399.19,219.91 -397.24,219.91 -383.91,206.58 -381.96,206.58 -377.4,211.13 -377.4,213.08 -390.73,226.41 -390.73,228.36 -386.18,232.92 -384.23,232.92 -370.9,219.59 -368.95,219.59 -364.39,224.14 -364.39,226.09 -377.72,239.42 -377.72,241.37 -373.17,245.93 -371.22,245.93 -358.57,233.29 -356.62,233.29 -352.07,237.84 -352.07,239.79 -353.34,241.06 -353.34,244.54 -348.44,249.44 -330.95,266.93 U1.A19@-299.46,266.93
ETH_TX_CTRL: U1.F14 U6.19 | length 732
  Top w4.2: U6.19@-661.6,-115.9 -624.9,-115.9 -590,-81 -590,-56 v1(-589,-55) ; v1(-157.72,125.2) U1.F14@-141.98,109.45
  Layer 1 w5: v1(-589,-55) -589,15.74 -536.74,68 -536.45,68 -495.45,109 -285.74,109 -283.24,109 -280.32,111.93 -280.32,122.16 -278.82,123.66 -271.82,123.66 -270.32,122.16 -270.32,106.07 -268.82,104.57 -261.82,104.57 -260.32,106.07 -257.39,109 -232,109 -216.41,109 -204,121.41 -204,130 -203.72,130.28 -203.72,131.2 -193.92,141 -173.53,141 v1(-157.72,125.2)
ETH_TXD0: U1.E14 U6.18 | length 731.7
  Top w4.2: U6.18@-661.6,-131.6 -594.6,-131.6 -558,-95 -558,-50 v1(-559,-49) ; v1(-189.22,125.2) U1.E14@-173.47,109.45
  Layer 1 w5: v1(-559,-49) -451,59 -289,59 -283.66,64.34 -281.16,66.84 -281.16,82.5 -279.66,84 -272.66,84 -271.16,82.5 -271.16,65.5 -269.66,64 -262.66,64 -261.16,65.5 -261.16,82.5 -259.66,84 -252.66,84 -251.16,82.5 -251.16,66.85 -249.66,65.35 -242.66,65.35 -241.16,66.85 -241.16,81.93 -239.66,83.43 -232.66,83.43 -231.16,81.93 -228.23,79 -217,79 -202,79 -191,90 -191,123.42 v1(-189.22,125.2)
ETH_TXD1: U1.B18 U6.17 | length 748.4
  Top w4.2: U6.17@-661.6,-147.4 -593.4,-147.4 -531,-85 -531,12 -470,73 -470,106.94 -445.97,130.97 -444.49,132.46 -444.49,135.93 -446.44,137.89 -446.44,139.84 -441.89,144.4 -439.94,144.4 -429.04,133.5 -427.09,133.5 -422.54,138.06 -422.54,140.01 -433.43,150.9 -433.43,152.85 -428.88,157.41 -426.93,157.41 -416.03,146.51 -414.08,146.51 -409.53,151.07 -409.53,153.02 -420.42,163.91 -420.42,165.86 -415.87,170.42 -413.91,170.42 -403.02,159.53 -401.07,159.53 -396.52,164.08 -396.52,166.03 -402.74,172.25 -402.74,174.2 -398.18,178.76 -396.23,178.76 -393.72,176.24 -391.77,176.24 -387.21,180.8 -387.21,182.75 -388.96,184.5 -388.96,187.98 -349.97,226.97 -324.94,252 -306.09,252 ; -306.06,251.97 -284.5,251.97 U1.B18@-267.96,235.43
ETH_TXD2: U1.D10 U6.16 | length 732
  Top w4.2: U6.16@-661.6,-163.1 -661.02,-163.68 -625.32,-163.68 v1(-624.74,-164.26) ; v1(-220.72,-32.28) U1.D10@-204.97,-16.54
  Layer 1 w5: v1(-624.74,-164.26) -580.26,-164.26 -463,-47 -390,-47 -387.5,-47 -384.57,-44.07 -384.57,-33.5 -383.07,-32 -376.07,-32 -374.57,-33.5 -374.57,-60.5 -373.07,-62 -366.07,-62 -364.57,-60.5 -364.57,-33.5 -363.07,-32 -356.07,-32 -354.57,-33.5 -354.57,-60.5 -353.07,-62 -346.07,-62 -344.57,-60.5 -344.57,-33.5 -343.07,-32 -336.07,-32 -334.57,-33.5 -334.57,-51.14 -333.07,-52.64 -326.07,-52.64 -324.57,-51.14 -324.57,-33.5 -323.07,-32 -316.07,-32 -314.57,-33.5 -314.57,-47.78 -313.07,-49.28 -306.07,-49.28 -304.57,-47.78 -304.57,-33.52 -303.07,-32.02 -296.07,-32.02 -294.57,-33.52 -294.57,-49.93 -293.07,-51.43 -286.07,-51.43 -284.57,-49.93 -281.64,-47 -249,-47 -235.43,-47 v1(-220.72,-32.28)
ETH_TXD3: U1.A17 U6.15 | length 748.4
  Top w4.2: U6.15@-661.6,-178.9 -598.9,-178.9 -510.5,-90.5 -510.5,9.5 -444,76 -444,86 -444,88.97 -459.21,104.18 -459.21,106.13 -454.66,110.69 -452.71,110.69 -435.88,93.86 -433.93,93.86 -429.37,98.41 -429.37,100.37 -446.2,117.19 -446.2,119.14 -441.65,123.7 -439.69,123.7 -422.87,106.87 -420.92,106.87 -416.36,111.42 -416.36,113.38 -425.02,122.03 -425.02,123.98 -420.46,128.54 -418.51,128.54 -409.86,119.88 -407.91,119.88 -403.35,124.44 -403.35,126.39 -412.01,135.04 -412.01,136.99 -407.45,141.55 -405.5,141.55 -399.09,135.13 -397.13,135.13 -392.58,139.69 -392.58,141.64 -398.23,147.29 -398.23,150.77 -354,195 -345.06,203.94 U1.A17@-299.46,203.94
GATE1: Q2.4 U17.12 | length 190.3
  Top w9: U17.12@-1150,934.83 -1115.84,934.83 v1(-1114.92,933.91) ; v1(-987,940) -986.85,940.15 -986.85,964.12 Q2.4@-986.7,964.27
  Bottom w9: v1(-1114.92,933.91) -993.09,933.91 v1(-987,940)
GATE2: Q3.4 U17.5 | length 109.5
  Top w8: Q3.4@-1347.48,964.27 -1347.48,946.69 -1335.62,934.83 U17.5@-1260.48,934.83